# Altium PCB ESP32_HID.PcbDoc (part 2 of 2)
Units mm, origin at the board's own origin, x right, y up, seen from the top; angles counter-clockwise.
Board outline 200 x 178.5 mm, 4 copper layers (Top Layer, Layer 1, Layer 2, Bottom Layer), stack 1.781 mm thick; 132 components, 105 nets, 776 pads, 137 vias.
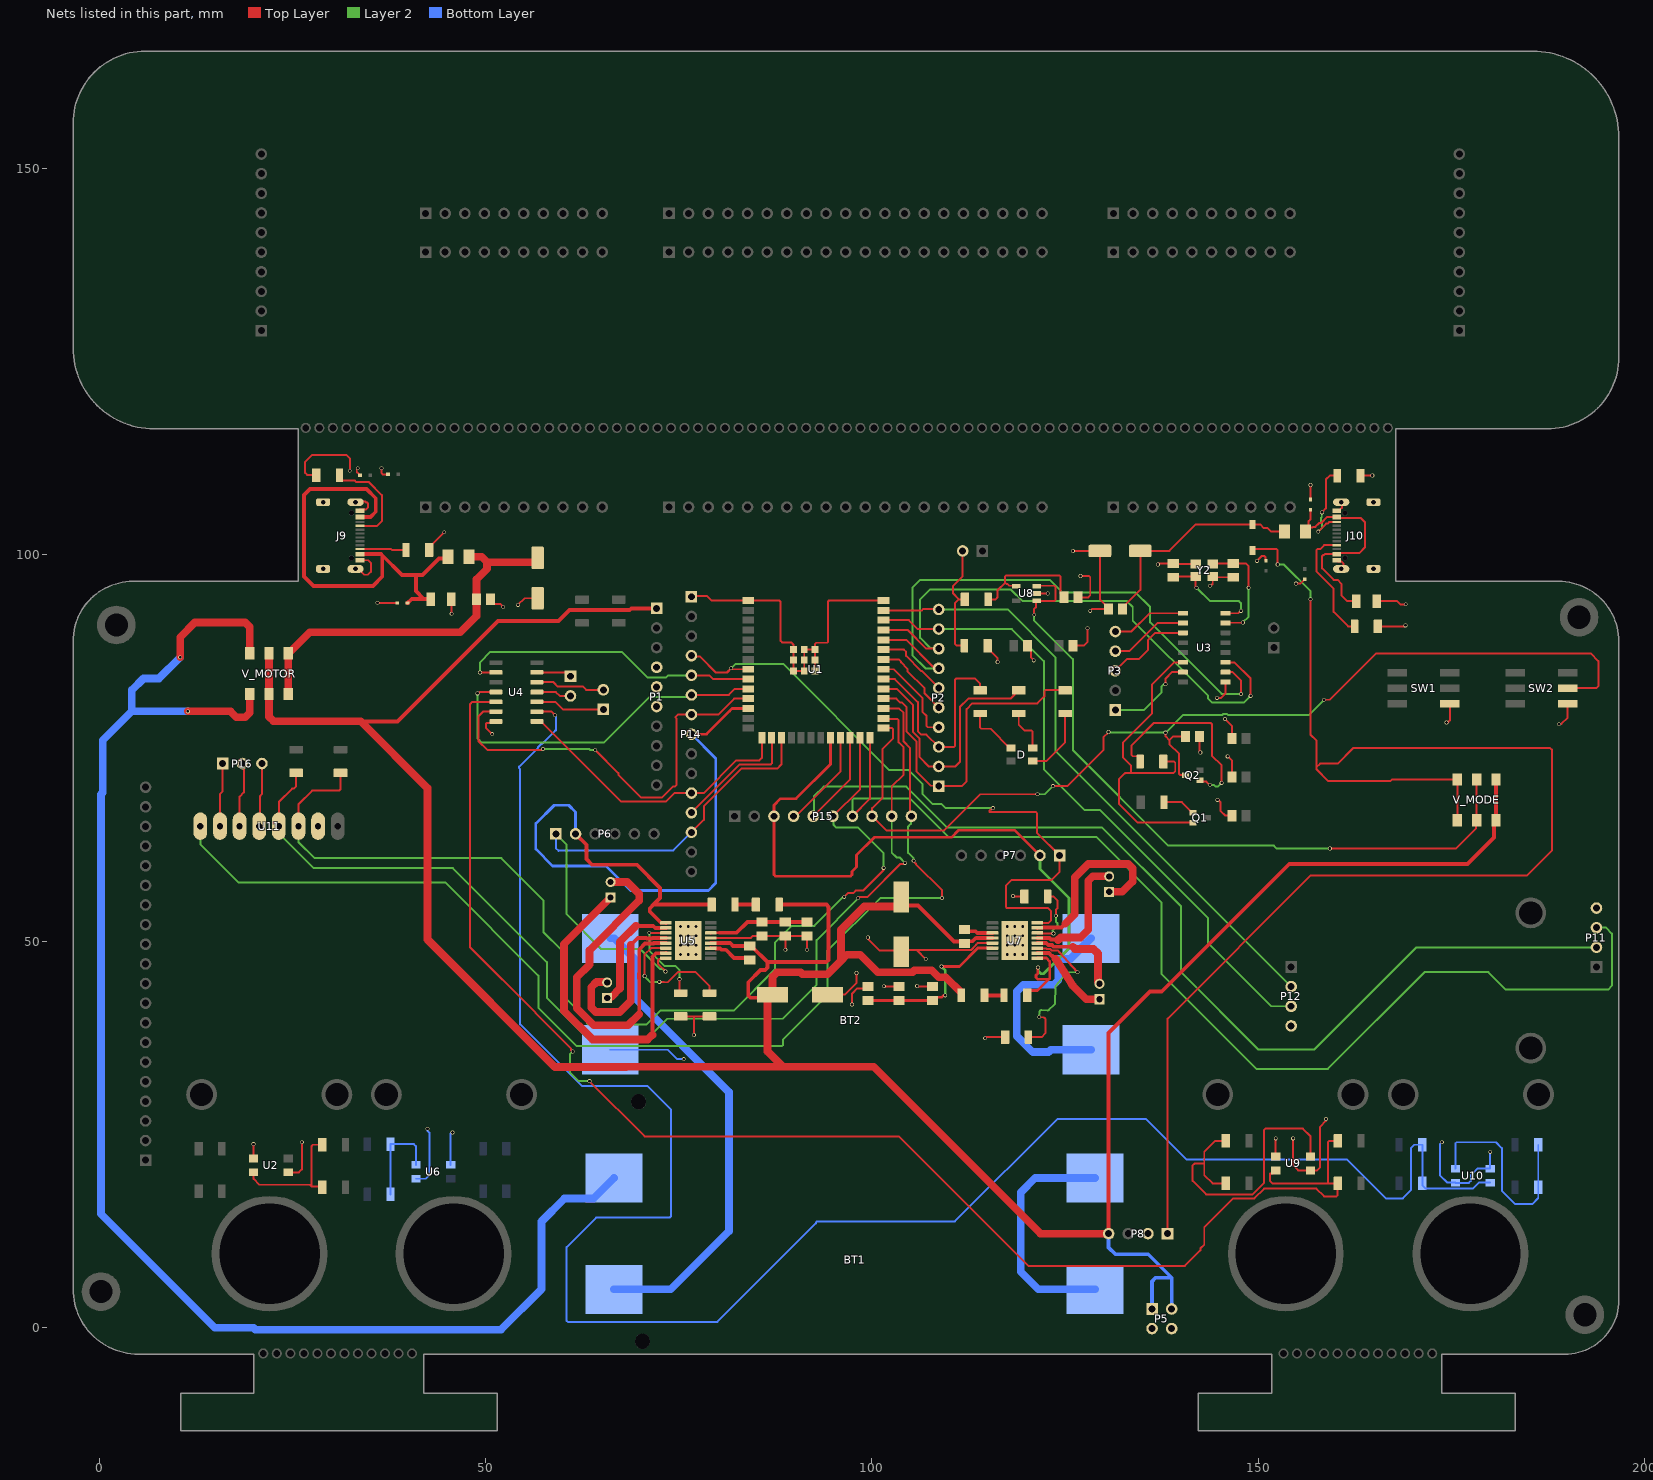
[diagram p4: the nets of this part, all layers, seen from the top]

## Via types
v1: diameter 0.5, hole 0.35, Top Layer to Bottom Layer, 137 vias

## Nets (pads, with @x,y where several pads share a name; then routed paths per layer and width w, separated by ;. In a path a pad name is that pad's centre, name@x,y a point inside that pad or via, vN(x,y) a via of type N, cw(c..) or ccw(c..) an arc to the next point about the centre after c; other vN are vias at no path point) (continued)
Encod3: R37.1 R38.1 U4.5 U9.4 | length 191.6
  Top Layer w0.254: U4.5@51.355,80.98 48.318,80.98 48,80.662 48,49.25 56.5,40.75 56.5,40.687 61.05,36.137 61.05,35.899 61.085,35.899 61.233,35.75 v1(61.3,35.75) ; v1(63.45,31.9) 70.6,24.75 103.5,24.75 120.25,8 140.5,8 142.5,10 142.5,10.25 143,10.75 143,13 146.75,16.75 149.5,16.75 150.75,18 157.5,18 158.5,17 160.101,17 160.25,17.149 160.25,18.64 R38.1@160.285,18.675 159,18.675 ; U9.4@152.25,20.35 151.877,19.977 151.527,19.977 151.527,19.877 151.5,19.85 151.5,19 151.825,18.675 159,18.675 ; R37.1@160.285,24.175 159.175,24.175 159,24 159,18.675
  Layer 2 w0.254: v1(61.3,35.75) 60.925,35.375 60.925,33.075 62.1,31.9 v1(63.45,31.9)
Encod4: R41.1 R42.1 U4.9 U10.4 | length 253.9
  Top Layer w0.254: U4.9@56.645,79.71 56.685,79.75 58.5,79.75 v1(59,79.25)
  Bottom Layer w0.254: v1(59,79.25) 59.101,79.149 59.101,77.25 59.006,77.25 57.262,75.506 57.189,75.506 56.819,75.136 56.819,75.063 54.355,72.6 54.355,72.395 54.5,72.25 54.5,39.25 62.5,31.25 71,31.25 74,28.25 74,14.399 73.851,14.25 64.308,14.25 60.5,10.442 60.5,0.899 60.649,0.75 80,0.75 92.75,13.5 92.75,13.601 92.899,13.75 110.75,13.75 124,27 135.5,27 140.75,21.75 161.5,21.75 166.5,16.75 168.705,16.75 169.75,17.795 169.75,23.25 170.175,23.675 R41.1@171.215,23.675 R42.1@171.215,18.675 171.215,18.411 171.633,17.993 177.743,17.993 178.525,18.775 U10.4@180,18.775
GLCD_CON1: P15.6 R20.1 U1.25 U11.SCL | length 138
  Top Layer w0.254: U11.SCL@25.81,64.89 25.81,67.735 27.575,69.5 31.076,69.5 31.225,69.649 31.225,71.76 R20.1@31.25,71.785 ; P15.6@94.95,66.175 98.465,69.69 U1.25@98.465,76.325 ; v1(96.425,55.75) 96.9,56.225 97.575,56.225 97.9,56.55 98.85,56.55 101.525,59.225 v1(101.525,59.5)
  Layer 2 w0.254: U11.SCL@25.81,64.89 25.81,62.84 27.85,60.8 33.75,60.8 33.775,60.775 42.6,60.775 42.625,60.75 52.05,60.75 57.5,55.3 57.5,51.2 59.825,48.875 59.825,43.2 63.15,39.875 63.15,39.374 63.299,39.225 70.825,39.225 72.625,41.025 82.125,41.025 87.45,46.35 87.45,49.825 89.625,52 92.55,52 96.225,55.675 96.283,55.675 96.358,55.75 v1(96.425,55.75) ; P15.6@94.95,66.175 95.056,66.069 95.056,65.044 95.35,64.75 98.15,64.75 101.525,61.375 v1(101.525,59.5)
GLCD_CON2: P15.9 R19.1 U1.28 U11.SDA | length 138.5
  Top Layer w0.254: U11.SDA@23.27,64.89 23.27,68.02 25,69.75 25.2,69.75 25.5,70.05 R19.1@25.5,71.785 ; v1(98.2,55.575) 98.267,55.575 98.442,55.75 99.45,55.75 103.703,60.003 104.061,60.003 104.208,60.15 v1(104.275,60.15) ; U1.28@101.5,78.845 101.57,78.775 103.301,78.775 103.45,78.626 103.45,75.725 104.095,75.08 104.095,71.559 102.57,70.034 P15.9@102.57,66.175
  Layer 2 w0.254: U11.SDA@23.27,64.89 23.27,64.001 27.796,59.475 45.775,59.475 57.95,47.3 57.95,42.7 63,37.65 71.2,37.65 73.525,39.975 88.475,39.975 92.85,44.35 92.85,50.15 98.2,55.5 v1(98.2,55.575) ; P15.9@102.57,66.175 102.57,61.48 103.211,60.839 103.586,60.839 v1(104.275,60.15)
GLCD_CON3: P15.10 U1.29 U11.INT | length 152.5
  Top Layer w0.254: U1.29@101.5,80.115 103.535,80.115 104.1,79.55 104.1,75.85 104.95,75 104.95,66.335 P15.10@105.11,66.175 ; v1(105.4,60.425) 105.4,60.358 105.7,60.058 105.7,59.95 109.075,56.575 v1(109.075,55.6)
  Layer 2 w0.254: U11.INT@13.11,64.89 13.11,62.54 18.025,57.625 44.775,57.625 56.85,45.55 56.85,41.4 61.825,36.425 88.355,36.425 88.504,36.574 88.504,37.296 94.25,43.042 94.25,48.75 101.125,55.625 103.675,55.625 103.7,55.6 v1(109.075,55.6) ; P15.10@105.11,66.175 105.043,66.108 105.043,65.193 104.7,64.85 104.7,61.45 105.37,60.78 105.37,60.455 v1(105.4,60.425)
GLCD_CON4: P2.1 R21.1 U1.30 | length 43.3
  Top Layer w0.254: U1.30@101.5,81.385 103.165,81.385 103.625,80.925 103.875,80.925 104.5,80.3 104.5,77.125 105.75,75.875 105.75,71.975 107.6,70.125 108.6,70.125 P2.1@108.65,70.075 111.6,70.075 112.25,70.725 112.25,80.025 113,80.775 121.4,80.775 122.325,81.7 122.325,82.351 122.474,82.5 124.965,82.5 R21.1@125,82.465
GLCD_CON5: P2.2 R23.1 U1.31 | length 33.3
  Top Layer w0.254: U1.31@101.5,82.655 103.195,82.655 105.325,80.525 105.325,77.075 106.15,76.25 106.15,73.85 107.385,72.615 P2.2@108.65,72.615 110.765,72.615 111.4,73.25 111.4,80.325 112.475,81.4 117.935,81.4 R23.1@119,82.465
GLCD_CON6: P2.3 R22.1 U1.32 | length 28.2
  Top Layer w0.254: U1.32@101.5,83.925 102.975,83.925 105.95,80.95 105.95,77.175 106.375,76.75 107.055,76.75 P2.3@108.65,75.155 110.631,75.155 110.78,75.304 110.78,83.871 110.929,84.02 113.28,84.02 114,83.3 R22.1@114,82.465
GLCD_CON7: P2.4 U1.33 | length 12.1
  Top Layer w0.254: U1.33@101.5,85.195 102.805,85.195 106.575,81.425 106.575,79.65 107.075,79.15 107.075,77.844 107.224,77.695 P2.4@108.65,77.695
GLCD_CON8: P2.5 U1.34 | length 10.4
  Top Layer w0.254: U1.34@101.5,86.465 103.485,86.465 103.775,86.175 103.775,86.075 104.6,85.25 104.6,84.95 106.825,82.725 106.825,82.06 P2.5@108.65,80.235
GLCD_CON9: P2.6 U1.35 | length 9.5
  Top Layer w0.254: U1.35@101.5,87.735 104.14,87.735 104.425,87.45 104.425,86.925 106.35,85 106.425,85 P2.6@108.65,82.775
GND: BT2.N1 C1.1 C2.1 C3.1 C4.1 C5.2 C6.2 C7.2 C8.2 C9.2 C13.2 C14.2 C15.2 C16.2 C17.1 C18.1 C20.N C21.1 C22.1 C23.1 C24.1 C25.N C26.1 CV.2 D2.1 D3.1 D4.1 D5.1 D6.1 D7.1 J9.A1_B12 J9.B1_A12 J9.SH1 J9.SH2 J9.SH3 J9.SH4 J10.A1_B12 J10.B1_A12 J10.SH1 J10.SH2 J10.SH3 J10.SH4 P1.4 P1.5 P1.6 P5.3 P5.4 P8.2 P11.4 P12.4 P14.1 R6.1 R7.1 R10.1 R11.1 R12.1 R13.1 R17.1 R27.1 R30.1 SW1.3 SW2.3 U1.1 U1.40 U1.41_1 U1.41_2 U1.41_3 U1.41_4 U1.41_5 U1.41_6 U1.41_7 U1.41_8 U1.41_9 U2.2 U2.3 U3.1 U4.7 U5.13 U5.17 U5.18 U5.19 U5.20 U5.21 U5.22 U5.23 U5.24 U5.25 U5.26 U5.27 U5.28 U5.29 U6.2 U6.3 U7.13 U7.17 U7.18 U7.19 U7.20 U7.21 U7.22 U7.23 U7.24 U7.25 U7.26 U7.27 U7.28 U7.29 U8.2 U9.2 U9.3 U10.2 U10.3 U11.GND Y2.2 Y2.4 | length 280.4
  Top Layer w0.254: U2.3@20,21.9 v1(20,23.75) ; U2.2@24.5,20.1 25.85,20.1 26.25,20.5 v1(26.25,24) ; R13.1@28.125,110.3 28.075,110.35 26.925,110.35 26.675,110.6 26.675,112.025 27.575,112.925 32,112.925 32.45,112.475 v1(32.45,110.875) ; J9.SH2@33.18,98.18 33.574,98.18 34.275,97.479 34.275,97.425 34.8,97.425 35.175,97.8 35.175,98.95 34.825,99.3 J9.B1_A12@33.755,99.3 ; J9.SH1@33.18,106.82 33.26,106.9 34.425,106.9 34.55,106.775 34.676,106.775 34.825,106.626 34.825,106.15 34.548,105.873 33.711,105.873 33.646,105.809 J9.A1_B12@33.755,105.7 ; v1(33.475,111.2) 33.475,111.133 33.347,111.006 33.347,110.718 33.652,110.413 33.652,110.373 33.725,110.3 D7.1@33.765,110.3 ; v1(36.025,93.8) 36.075,93.75 D5.1@38.59,93.75 ; v1(36.55,111.2) 36.525,111.175 36.525,110.6 36.7,110.425 D6.1@37.4,110.425 ; R12.1@42.715,100.625 42.715,100.965 v1(44.675,102.925) ; C18.1@45.6,94.25 45.625,94.225 v1(45.625,92.375) ; C23.1@50.65,94.25 50.65,94.1 51.098,93.652 51.898,93.652 v1(52.3,93.25) ; v1(50.875,76.8) 50.05,77.625 50.05,78.123 50.199,78.272 51.187,78.272 U4.7@51.355,78.44 ; v1(54.2,93.525) 55.06,94.385 C20.N@56.75,94.385 ; R6.1@75.25,40.285 77.125,40.285 ; P14.1@76.65,94.575 76.725,94.65 78.7,94.65 79.265,94.085 U1.1@84,94.085 88.026,94.085 88.175,93.936 88.175,88.875 88.375,88.675 89.575,88.675 89.85,88.4 U1.41_1@89.85,87.765 U1.41_4@89.85,86.365 U1.41_7@89.85,84.965 U1.41_8@91.25,84.965 U1.41_5@91.25,86.365 U1.41_2@91.25,87.765 U1.41_3@92.65,87.765 ; v1(76.965,37.865) 77,37.9 77,40.16 77.125,40.285 ; R7.1@79,40.285 77.125,40.285 ; U5.13@79.15,50.425 84.325,50.425 84.6,50.7 C8.2@85.8,50.7 C7.2@88.8,50.7 ; v1(88.8,48.9) C7.2@88.8,50.7 ; v1(91.6,48.9) C9.2@91.6,50.7 C7.2@88.8,50.7 ; U1.41_9@92.65,84.965 U1.41_6@92.65,86.365 U1.41_3@92.65,87.765 ; CV.2@94.25,43.1 96.5,43.1 98,44.6 98,45.883 v1(98.009,45.891) ; v1(97.425,41.825) 97.425,43.225 98.1,43.9 98.902,43.9 98.95,43.948 98.95,44.075 99.025,44.15 C14.2@99.5,44.15 ; v1(99.475,50.5) 99.475,50.3 100.95,48.825 103.625,48.825 C16.2@103.8,48.65 104.021,48.871 105.804,48.871 ; U1.40@101.5,94.085 101.486,94.099 94.398,94.099 94.375,94.076 94.375,93.975 94.35,93.95 94.35,88.774 94.201,88.625 92.799,88.625 92.65,88.476 U1.41_3@92.65,87.765 ; v1(101.55,44.175) 101.575,44.15 C13.2@103.5,44.15 ; v1(105.85,44.225) 105.925,44.15 C15.2@107.85,44.15 ; v1(106.975,47.7) 105.804,48.871 ; v1(114.65,37.45) 114.8,37.6 R10.1@117.235,37.6 ; R17.1@114.965,88.25 114.965,87.91 116.275,86.6 v1(116.275,86.125) ; U7.13@115.6,49.775 113.675,49.775 113.456,49.556 113.456,49.497 112.83,48.871 105.804,48.871 ; v1(118.25,55.85) 118.3,55.8 R11.1@119.735,55.8 ; C21.1@120.15,88.25 120.598,87.802 120.598,86.702 v1(120.95,86.35) ; U8.2@121.3,95 v1(122.75,95) ; C22.1@126,88.25 127.425,88.25 127.925,88.75 127.925,90.475 v1(127.9,90.5) ; v1(126,100.5) C25.N@129.5,100.5 129.5,94.25 130.6,93.15 C26.1@130.6,93 128.5,93 v1(128.25,92.75) ; C17.1@126.65,94.5 128,94.5 128.25,94.75 128.25,97.101 128.101,97.25 v1(127,97.25) ; v1(137,98.75) 137.15,98.9 C6.2@139,98.9 139.1,98.8 Y2.2@141.9,98.8 ; C2.1@142.4,76.5 142.4,74.525 v1(142.5,74.425) ; v1(143.75,96) 143.817,96 143.965,96.149 144.1,96.149 Y2.4@144.1,97.2 144.2,97.1 C5.2@146.75,97.1 ; v1(144.65,81.5) 145.175,81.5 145.75,82.075 U3.1@145.75,83.555 ; v1(144.725,68.3) 144.792,68.3 145.067,68.025 145.1,68.025 145.1,66.9 145.75,66.25 C1.1@146.6,66.25 ; v1(145.7,78.75) 146.6,77.85 C3.1@146.6,76.25 ; v1(146.025,73.925) 146.6,73.35 C4.1@146.6,71.25 ; v1(149.825,99.225) 150.45,99.85 150.75,99.85 150.927,99.673 150.927,99.323 D4.1@151,99.25 ; U9.2@152.25,22.15 v1(152.25,24.5) ; v1(154.5,24.5) 154.5,21 155.15,20.35 U9.3@156.75,20.35 157.6,20.35 158,20.75 158,26 158.75,26.75 v1(158.75,27) ; v1(154.875,96.275) 155.435,96.275 155.887,96.727 155.927,96.727 156,96.8 D3.1@156,96.84 ; D2.1@156.75,107.16 v1(156.75,109.025) ; J10.A1_B12@160.145,99.3 160.318,99.127 160.781,99.127 160.996,98.912 160.996,98.456 J10.SH1@160.72,98.18 ; J10.B1_A12@160.145,105.7 160.42,105.7 160.808,106.088 160.808,106.732 J10.SH2@160.72,106.82 ; R30.1@163.215,110.25 164.725,110.25 v1(164.75,110.275) ; C24.1@165.35,94 167.95,94 168.4,93.55 169.025,93.55 v1(169.075,93.6) ; R27.1@165.465,90.75 168.925,90.75 v1(169.05,90.875) ; v1(174.35,78.3) 174.5,78.3 174.775,78.575 SW1.3@174.775,80.75 ; v1(188.9,78.075) 188.95,78.125 189.2,78.125 190.025,78.95 SW2.3@190.025,80.75
  Bottom Layer w0.254: U6.3@41,19.275 42.275,19.275 42.75,19.75 42.75,25.25 42.5,25.5 v1(42.5,25.75) ; U6.2@45.5,21.075 45.5,25.101 45.535,25.101 45.683,25.25 v1(45.75,25.25) ; BT2.N1@66.145,35.965 73.615,35.965 74.826,34.754 v1(75.665,34.754) ; v1(173.75,24) 173.5,23.75 173.5,19.75 174.475,18.775 U10.3@175.5,18.775 175.525,18.75 177.25,18.75 177.5,19 177.5,19.75 178.325,20.575 U10.2@180,20.575 v1(180,22.75)
IN: U8.1 U8.3 V_MODE.2 V_MODE.5 | length 93
  Top Layer w0.254: v1(121,92.25) 121,93 121.25,93.25 121.25,93.9 121.35,94 123.601,94 123.75,94.149 123.75,95.851 123.601,96 121.35,96 U8.3@121.3,95.95 ; v1(159.25,62) 175.525,62 178.168,64.643 178.168,65.593 V_MODE.2@178.25,65.675 V_MODE.5@178.25,70.925
  Layer 2 w0.254: v1(121,92.25) 121,91.5 126,86.5 126,74.75 138.365,62.385 152.011,62.385 152.396,62 v1(159.25,62)
IO0: C2.2 P15.8 Q2.3 SW2.2 U1.27 | length 136.1
  Top Layer w0.254: U1.27@101.5,77.575 102.601,77.575 102.75,77.426 102.75,76.275 101.375,74.9 101.375,68.575 100.03,67.23 P15.8@100.03,66.175 101.9,64.305 109.305,64.305 114.025,69.025 v1(121.425,69.025) ; v1(123.425,70.075) 125.3,70.075 129.95,74.725 129.95,76.4 v1(130.625,77.075) ; v1(138,77) 138,76.5 138.5,76 ; Q2.3@140.55,71.5 139.899,71.5 139.75,71.649 139.75,74.25 138.5,75.5 138.5,76 ; C2.2@140.6,76.5 139,76.5 138.5,76 ; v1(158.5,81.25) 159.25,81.25 165.25,87.25 193,87.25 194,86.25 194,83 193.75,82.75 SW2.2@190.025,82.75
  Layer 2 w0.254: v1(121.425,69.025) 122.375,69.025 v1(123.425,70.075) ; v1(130.625,77.075) 130.663,77.038 137.963,77.038 v1(138,77) 140.25,79.25 145.308,79.25 145.439,79.381 145.961,79.381 146.092,79.25 156.5,79.25 v1(158.5,81.25)
IO1: P2.10 P12.2 U1.39 | length 80.1
  Top Layer w0.254: U1.39@101.5,92.815 106.465,92.815 106.625,92.975 108.61,92.975 P2.10@108.65,92.935
  Layer 2 w0.254: P2.10@108.65,92.935 117.565,92.935 123.75,86.75 123.75,74.635 137.135,61.25 P12.2@154.25,44.135
IO2: P2.9 P12.3 U1.38 | length 83.5
  Top Layer w0.254: U1.38@101.5,91.545 104.78,91.545 105.93,90.395 P2.9@108.65,90.395
  Layer 2 w0.254: P2.9@108.65,90.395 118.105,90.395 122.25,86.25 122.25,72.25 127.5,67 129.5,67 143.5,53 143.5,49.75 151.655,41.595 P12.3@154.25,41.595
IO3: P14.11 U1.15 U4.8 | length 38.4
  Top Layer w0.254: U4.8@56.645,78.44 57.185,78.44 67.55,68.075 73.35,68.075 74.45,69.175 P14.11@76.65,69.175 78.25,69.175 82.475,73.4 85.45,73.4 85.765,73.715 U1.15@85.765,76.325
IO16: P14.5 U1.9 U4.2 | length 40.3
  Top Layer w0.254: v1(49.3,84.775) 49.315,84.79 U4.2@51.355,84.79 ; P14.5@76.65,84.415 78.985,84.415 79.475,83.925 U1.9@84,83.925
  Layer 2 w0.254: v1(49.3,84.775) 49.3,86.1 50.65,87.45 67.65,87.45 70.95,84.15 73.375,84.15 73.64,84.415 P14.5@76.65,84.415
IO17: P14.6 U1.10 U4.4 | length 46.4
  Top Layer w0.254: v1(48.975,82.075) 49.075,82.075 49.25,82.25 U4.4@51.355,82.25 ; P14.6@76.65,81.875 81.5,81.875 82.28,82.655 U1.10@84,82.655
  Layer 2 w0.254: v1(48.975,82.075) 48.975,76.25 49.525,75.7 65.3,75.7 71.2,81.6 75.878,81.6 75.915,81.637 76.412,81.637 P14.6@76.65,81.875
IO18: P14.7 U1.11 U4.6 | length 54.5
  Top Layer w0.254: U4.6@51.355,79.71 49.685,79.71 49.1,79.125 49.1,75.9 50.275,74.725 57.3,74.725 v1(57.45,74.875) ; v1(64.2,74.75) 67.199,71.751 67.199,71.551 70.15,68.6 72.825,68.6 74.277,70.052 74.551,70.052 74.7,70.201 74.7,78.825 74.605,78.92 74.605,79.054 74.886,79.335 P14.7@76.65,79.335 80.135,79.335 82.185,81.385 U1.11@84,81.385
  Layer 2 w0.254: v1(57.45,74.875) 63.442,74.875 63.567,74.75 v1(64.2,74.75)
IO21: P15.4 U1.23 | length 12.8
  Top Layer w0.254: P15.4@89.87,66.175 90.15,66.175 95.925,71.95 U1.23@95.925,76.325
IO33: P11.2 P15.5 U1.24 | length 141
  Top Layer w0.254: P15.5@92.41,66.175 97.195,70.96 U1.24@97.195,76.325
  Layer 2 w0.254: P15.5@92.41,66.175 92.5,66.265 92.5,68.75 93.75,70 104.45,70 109.7,64.75 129.75,64.75 140,54.5 140,46 150,36 157.25,36 170.465,49.215 P11.2@193.75,49.215
IO45: P11.3 P15.7 U1.26 | length 146.9
  Top Layer w0.254: P15.7@97.49,66.175 99.735,68.42 U1.26@99.735,76.325
  Layer 2 w0.254: P15.7@97.49,66.175 97.5,66.185 97.5,68.351 97.649,68.5 104.875,68.5 109.875,63.5 129,63.5 137.5,55 137.5,45.75 149.75,33.5 159,33.5 171.5,46 179.75,46 182,43.75 195.25,43.75 195.75,44.25 195.75,51 194.995,51.755 193.755,51.755 193.75,51.75 P11.3@193.75,51.755
IO46: P14.12 U1.16 | length 16.4
  Top Layer w0.254: P14.12@76.65,66.635 82.915,72.9 86.926,72.9 87.075,73.049 87.075,76.285 U1.16@87.035,76.325
NetBT1_N1: BT1.N1 BT2.P2 | length 62.5
  Bottom Layer w1: BT2.P2@66.145,50.385 66.64,50.385 69.315,47.71 69.315,42.685 81.5,30.5 81.5,12.5 73.965,4.965 BT1.N1@66.645,4.965
NetBT1_N2: BT1.N2 BT1.P1 | length 31.2
  Bottom Layer w1: BT1.P1@128.855,4.965 121.535,4.965 119.25,7.25 119.25,17.5 121.135,19.385 BT1.N2@128.855,19.385
NetBT2_N2: BT2.N2 BT2.P1 | length 30.4
  Bottom Layer w1: BT2.P1@128.355,35.965 123.161,35.965 122.86,35.664 120.836,35.664 118.75,37.75 118.75,43.5 119.612,44.362 123.524,44.362 124.11,44.948 124.11,47.71 125.68,47.71 BT2.N2@128.355,50.385
NetC5_1: C5.1 U3.7 Y2.1 | length 14.7
  Top Layer w0.254: Y2.1@144.1,98.8 144.2,98.9 C5.1@146.75,98.9 148.35,98.9 148.75,98.5 v1(148.75,95.75) ; U3.7@145.75,91.175 145.788,91.212 147.963,91.212 v1(148,91.25)
  Layer 2 w0.254: v1(148,91.25) 148.75,92 v1(148.75,95.75)
NetC6_1: C6.1 U3.8 Y2.3 | length 14.1
  Top Layer w0.254: C6.1@139,97.1 139.1,97.2 Y2.3@141.9,97.2 141.9,95.85 v1(142,95.75) ; U3.8@145.75,92.445 147.378,92.445 147.683,92.75 v1(147.75,92.75)
  Layer 2 w0.254: v1(142,95.75) 143.75,94 147.5,94 147.75,93.75 v1(147.75,92.75)
NetC7_1: C7.1 C8.1 C9.1 U5.14 | length 13
  Top Layer w0.354: U5.14@79.15,51.075 79.175,51.1 80.3,51.1
  Top Layer w0.5: 80.3,51.1 82.5,51.1 83.9,52.5 C8.1@85.8,52.5 C7.1@88.8,52.5 C9.1@91.6,52.5
NetC11_2: C11.2 U5.11 | length 5.7
  Top Layer w0.5: U5.11@79.15,49.125 79.175,49.1 79.799,49.1 79.822,49.077 80.336,49.077 80.513,48.9 81.1,48.9 82.175,47.825 83.975,47.825 C11.2@84.2,47.6
NetC12_2: C12.2 U7.11 | length 3.8
  Top Layer w0.5: C12.2@112,51.5 112.2,51.3 113.4,51.3 113.625,51.075 U7.11@115.6,51.075
NetC13_1: C13.1 C14.1 C15.1 U7.14 | length 21.8
  Top Layer w0.354: C14.1@99.5,42.35 C13.1@103.5,42.35 C15.1@107.85,42.35 108.248,42.748 108.998,42.748 109.25,43 v1(109.5,43) ; v1(109,46.75) 111.319,46.75 113.694,49.125 U7.14@115.6,49.125
  Layer 2 w0.354: v1(109,46.75) 109,46.71 109.5,46.21 v1(109.5,43)
NetC17_2: C17.2 R16.2 U8.4 | length 16.2
  Top Layer w0.254: R16.2@115.04,94.25 116,94.25 116.25,94.5 116.25,95.399 117.25,96.399 ; U8.4@118.7,95.95 118.65,96 117.75,96 117.5,96.25 117.399,96.25 117.25,96.399 ; C17.2@124.85,94.5 124.402,94.948 124.402,95.239 124.394,95.247 124.394,97.207 124.245,97.356 117.399,97.356 117.25,97.207 117.25,96.399
NetC18_2: C18.2 D5.2 FL1.1 J9.A4_B9 J9.B4_A9 | length 58.8
  Top Layer w0.5: J9.B4_A9@33.755,100.1 36.5,100.1 36.65,99.95 ; J9.A4_B9@33.755,104.9 35.125,104.9 35.8,105.575 35.8,107.325 34.6,108.525 27.3,108.525 26.525,107.75 26.525,97.2 27.75,95.975 35.45,95.975 36.65,97.175 36.65,99.95 ; D5.2@39.91,93.75 40.46,94.3 42,94.3 ; C18.2@42.9,94.25 42.85,94.3 42,94.3 ; FL1.1@45.14,99.75 44.898,99.508 43.983,99.508 41.85,97.375 41,97.375 ; 36.65,99.95 39.225,97.375 41,97.375 ; 41,97.375 41,95.3 42,94.3
NetC24_2: C24.2 D2.2 FL2.1 J10.A4_B9 J10.B4_A9 | length 29.2
  Top Layer w0.254: FL2.1@156.11,103 FL2.1@156.5,103.39 ; D2.2@156.75,105.84 156.75,104.601 156.5,104.351 FL2.1@156.5,103.39 ; C24.2@162.65,94 161.5,94 160.75,94.75 160.75,96.25 160.25,96.75 159.75,96.75 158.25,98.25 158.25,99.851 158.399,100 158.5,100 158.6,100.1 J10.A4_B9@160.145,100.1 160.276,100.231 160.919,100.231 160.95,100.262 161.49,100.262 161.521,100.231 163.031,100.231 163.8,101 163.8,104.2 163.231,104.769 161.521,104.769 161.49,104.738 160.95,104.738 160.919,104.769 160.276,104.769 J10.B4_A9@160.145,104.9 158.9,104.9 158.119,104.119 157.869,104.119 157.381,103.631 157.131,103.631 157.042,103.542 156.652,103.542 FL2.1@156.5,103.39
NetC25_P: C25.P C26.2 D1.A FL2.2 | length 28.9
  Top Layer w0.254: C26.2@132.4,93 132.4,93.15 134.73,95.48 C25.P@134.73,100.5 138.5,100.5 141.93,103.93 D1.A@149.25,103.93 150.237,103.93 150.715,103.452 151.201,103.452 151.653,103 FL2.2@153.39,103
NetD_2: D.2 R21.2 | length 8.9
  Top Layer w0.254: D.2@120.8,73.3 122.55,73.3 125,75.75 R21.2@125,79.46
NetD_3: D.3 R23.2 | length 5.7
  Top Layer w0.254: R23.2@119,79.46 119,78 119.75,77.25 120.651,77.25 120.8,77.101 D.3@120.8,75
NetD_4: D.4 R22.2 | length 6.9
  Top Layer w0.254: R22.2@114,79.46 114,77.649 114.149,77.5 115.35,77.5 117.85,75 D.4@118,75
NetJ9_A5: J9.A5 R13.2 | length 13.2
  Top Layer w0.254: R13.2@31.13,110.3 31.13,109.951 31.473,109.608 33.117,109.608 33.3,109.425 34.9,109.425 36.6,107.725 36.6,104.35 36,103.75 J9.A5@33.755,103.75
NetJ9_B5: J9.B5 R12.2 | length 6
  Top Layer w0.254: J9.B5@33.755,100.75 37.8,100.75 37.925,100.625 R12.2@39.71,100.625
NetJ10_A5: J10.A5 R27.2 | length 15.3
  Top Layer w0.254: J10.A5@160.145,101.25 158.5,101.25 158,100.75 157.649,100.75 157.5,100.601 157.5,97.874 159.75,95.624 159.75,92.609 161.609,90.75 R27.2@162.46,90.75
NetJ10_B5: J10.B5 R30.2 | length 11.9
  Top Layer w0.254: v1(157.75,103) 158.784,104.034 158.966,104.034 159.181,104.25 J10.B5@160.145,104.25 ; v1(158.25,105.5) 158.75,106 158.75,109.75 159.25,110.25 R30.2@160.21,110.25
  Layer 2 w0.254: v1(157.75,103) 158.25,103.5 158.25,104.188 158.101,104.337 158.101,104.776 158.203,104.878 158.203,105.453 v1(158.25,105.5)
NetJ_M1_1: J_M1.1 U7.2 | length 11
  Top Layer w0.5: U7.2@121.4,48.475 122.9,48.475 123.278,48.096 123.404,48.096 123.75,47.75
  Top Layer w1: 123.75,47.75 123.751,47.749 cw(c123.044,47.042) 123.89,47.575 125.906,44.379 ccw(c126.752,44.913) 126.043,44.207 127.75,42.5 J_M1.1@129.45,42.5
NetJ_M1_2: J_M1.2 U7.4 | length 12.4
  Top Layer w0.5: U7.4@121.4,49.775 122.552,49.775 122.827,49.5 123.3,49.5 123.512,49.288 126,49.288
  Top Layer w1: 126,49.288 126.25,49 128.664,49 129.25,48.414 129.25,44.783 129.45,44.583 J_M1.2@129.45,44.5
NetJ_M2_1: J_M2.1 U7.7 | length 24.1
  Top Layer w0.5: U7.7@121.4,51.725 121.425,51.75 122.049,51.75 122.072,51.773 124.523,51.773 125.025,52.275
  Top Layer w1: 125.025,52.275 126.25,53.5 126.25,58.25 128,60 133.164,60 133.75,59.414 133.75,57.75 132.4,56.4 J_M2.1@130.7,56.4
NetJ_M2_2: J_M2.2 U7.5 | length 16.5
  Top Layer w0.5: U7.5@121.4,50.425 123.009,50.425 123.188,50.246 124.004,50.246 124.085,50.165
  Top Layer w1: 124.085,50.165 124.42,50.5 127,50.5 128,51.5 128,57.814 128.586,58.4 J_M2.2@130.7,58.4
NetJ_M3_1: J_M3.1 U5.2 | length 15.1
  Top Layer w0.5: 69.475,52 71.7,52 71.975,51.725 U5.2@73.35,51.725
  Top Layer w1: J_M3.1@65.75,42.675 65.904,42.829 66.329,42.829 67.4,43.9 67.4,49.925 69.475,52
NetJ_M3_2: J_M3.2 U5.4 | length 23.2
  Top Layer w0.5: 68.8,49.525 69.7,50.425 70.809,50.425 70.888,50.346 71.512,50.346 71.591,50.425 U5.4@73.35,50.425
  Top Layer w1: J_M3.2@65.75,44.675 65.691,44.734 64.366,44.734 63.675,44.043 63.675,41.436 64.261,40.85 67.375,40.85 68.8,42.275 68.8,49.525
NetJ_M4_1: J_M4.1 U5.7 | length 42.5
  Top Layer w0.5: 71.6,37.886 71.6,48 72.05,48.45 73.325,48.45 U5.7@73.35,48.475
  Top Layer w1: J_M4.1@66.2,55.675 60.15,49.625 60.15,41 63.85,37.3 71.014,37.3 71.6,37.886
NetJ_M4_2: J_M4.2 U5.5 | length 44.3
  Top Layer w0.5: 69.9,40.575 69.9,45.134 69.846,45.188 69.846,45.812 69.9,45.866 69.9,48.96 70.659,49.719 71.772,49.719 71.828,49.775 U5.5@73.35,49.775
  Top Layer w1: J_M4.2@66.2,57.675 66.204,57.671 68.354,57.671 69.911,56.114 69.911,55.286 63.475,48.85 63.475,47 61.825,45.35 61.825,41.325 64.025,39.125 68.45,39.125 69.9,40.575
NetP3_4: P3.4 U3.10 | length 10.3
  Top Layer w0.254: P3.4@131.5,87.54 133.29,87.54 136.925,91.175 U3.10@140.25,91.175
NetP3_5: P3.5 U3.9 | length 9.7
  Top Layer w0.254: P3.5@131.5,90.08 133.58,90.08 135.945,92.445 U3.9@140.25,92.445
NetP9_1: P9.1 U4.13 | length 4.6
  Top Layer w0.254: U4.13@56.645,84.79 60.5,84.79 P9.1@61,84.29
NetP9_2: P9.2 U4.11 | length 4.6
  Top Layer w0.254: U4.11@56.645,82.25 59.125,82.25 59.625,81.75 P9.2@61,81.75
NetP10_1: P10.1 U4.10 | length 9
  Top Layer w0.254: U4.10@56.645,80.98 59.02,80.98 60,80 P10.1@65.25,80
NetP10_2: P10.2 U4.12 | length 9
  Top Layer w0.254: U4.12@56.645,83.52 58.805,83.52 59.375,82.95 62.625,82.95 63.035,82.54 P10.2@65.25,82.54
NetP13_2: P13.2 R16.1 R17.2 | length 15.1
  Top Layer w0.254: P13.2@111.75,100.5 111.75,97.25 110.5,96 110.5,95 111.25,94.25 ; R17.2@111.96,88.25 111,88.25 110.75,88.5 110.75,93.75 111.25,94.25 ; R16.1@112.035,94.25 111.25,94.25
NetP16_1: P16.1 U11.ADO | length 8.3
  Top Layer w0.254: U11.ADO@15.65,64.89 15.65,69.05 16,69.4 P16.1@16,73
NetP16_2: P16.2 U11.XCL | length 8.4
  Top Layer w0.254: U11.XCL@18.19,64.89 18.19,68.715 18.75,69.275 18.75,72.79 P16.2@18.54,73
NetP16_3: P16.3 U11.XDA | length 8.3
  Top Layer w0.254: U11.XDA@20.73,64.89 20.85,65.01 20.85,68.8 21.08,69.03 P16.3@21.08,73
NetQ1_1: Q1.1 R1.2 | length 4.3
  Top Layer w0.254: R1.2@137.79,68 140.1,68 141.45,66.65 Q1.1@141.55,66.65
NetQ2_1: Q2.1 R2.2 | length 26.1
  Top Layer w0.254: R2.2@134.71,73.25 134.71,73.599 134.367,73.942 133.745,73.942 133.597,74.091 133.597,75.347 136.5,78.25 143.851,78.25 144,78.101 144,74 145.25,72.75 v1(145.25,70.5) ; Q2.1@142.45,70.85 142.648,70.652 143.281,70.652 143.683,70.25 v1(143.75,70.25)
  Layer 2 w0.254: v1(143.75,70.25) 143.797,70.203 144.293,70.203 144.496,70 144.75,70 v1(145.25,70.5)
NetR4_1: R4.1 R5.2 | length 2.7
  Top Layer w0.5: R5.2@82.29,54.75 R4.1@85,54.75
NetR6_2: R6.2 U5.3 | length 12.5
  Top Layer w0.254: v1(71.2,51.1) 72.2,51.1 72.225,51.075 U5.3@73.35,51.075 ; v1(75.1,45.1) 75.1,43.44 R6.2@75.25,43.29
  Layer 2 w0.254: v1(71.2,51.1) 71.2,48.8 73.2,46.8 74.6,46.8 75.1,46.3 v1(75.1,45.1)
NetR7_2: R7.2 U5.6 | length 16.9
  Top Layer w0.254: v1(70.6,45.5) 70.6,48.3 71.425,49.125 U5.6@73.35,49.125 ; v1(72.5,44.75) 72.547,44.703 73.122,44.703 73.125,44.7 73.6,44.7 74.9,46 77.2,46 79,44.2 R7.2@79,43.29
  Layer 2 w0.254: v1(70.6,45.5) 70.6,45.433 71.006,45.027 71.006,44.994 71.3,44.7 71.842,44.7 71.869,44.727 72.477,44.727 v1(72.5,44.75)
NetR8_1: R8.1 R9.2 | length 2.5
  Top Layer w0.5: R8.1@114.565,43 R9.2@117.095,43
NetR10_2: R10.2 U7.3 | length 20.8
  Top Layer w0.254: R10.2@120.24,37.6 121.95,37.6 122.45,38.1 122.45,39.876 ccw(c122.196,39.876) 122.227,40.128 v1(121.65,40.2) ; U7.3@121.4,49.125 121.442,49.083 122.531,49.083 122.635,48.979 123.109,48.979 123.303,48.784 124.085,48.784 124.202,48.667 124.211,48.657 v1(126.6,46)
  Layer 2 w0.254: v1(121.65,40.2) 121.683,40.848 cw(c121.937,40.835) 121.945,41.089 ; 121.946,41.089 122.719,41.061 ccw(c122.728,41.315) 122.9,41.128 123.615,41.793 ccw(c123.441,41.978) 123.695,41.969 123.773,44.111 cw(c124.027,44.101) 123.829,44.26 125.151,45.897 cw(c125.348,45.737) 125.401,45.985 ccw(c125.455,46.233) 125.459,45.979 v1(126.6,46)
NetR11_2: R11.2 U7.6 | length 8.4
  Top Layer w0.254: U7.6@121.4,51.075 121.475,51 v1(123.5,51) ; R11.2@122.74,55.8 123.46,55.8 124.025,55.235 124.025,54.308 123.8,54.083 v1(123.8,53.3)
  Layer 2 w0.254: v1(123.5,51) 123.453,51.047 123.453,51.257 123.355,51.355 124,52 124,52.342 123.8,52.542 v1(123.8,53.3)
NetR14_1: R14.1 R15.1 U2.1 | length 16.9
  Top Layer w0.254: U2.1@20,20.1 20,19.25 20.75,18.5 27.25,18.5 27.5,18.25 ; R14.1@28.885,18.175 28.81,18.25 27.5,18.25 ; R15.1@28.885,23.675 27.675,23.675 27.5,23.5 27.5,18.25
NetR31_1: R31.1 R32.1 U6.1 | length 12.3
  Bottom Layer w0.254: R32.1@37.715,17.25 R31.1@37.715,23.75 40.75,23.75 41,23.5 U6.1@41,21.075
NetR35_1: R35.1 R36.1 U9.1 | length 39.7
  Top Layer w0.254: R35.1@145.785,18.675 144.075,18.675 143,19.75 143,21.25 ; R36.1@145.785,24.175 144.425,24.175 143,22.75 143,21.25 ; U9.1@156.75,22.15 156.75,24.75 155.75,25.75 150.899,25.75 150.75,25.601 150.75,18.75 149.25,17.25 143.25,17.25 141.5,19 141.5,21 141.75,21.25 143,21.25
NetR39_1: R39.1 R40.1 U10.1 | length 27.8
  Bottom Layer w0.254: U10.1@175.5,20.575 175.5,23.851 175.649,24 180.75,24 181.5,23.25 181.5,17.75 183.25,16 185.43,16 186.215,16.785 R40.1@186.215,18.175 R39.1@186.215,23.675
NFAULT: P6.1 P14.13 U1.17 U5.8 | length 70.1
  Top Layer w0.254: v1(73.3,46.1) 72.35,47.05 72.35,47.578 72.499,47.727 73.252,47.727 U5.8@73.35,47.825 ; P14.13@76.65,64.095 78.275,65.72 78.275,67.475 83.175,72.375 87.5,72.375 87.545,72.33 87.755,72.33 88.305,72.88 U1.17@88.305,76.325
  Layer 2 w0.254: P6.1@59.12,63.9 60.5,62.52 60.5,53.5 65,49 70,49 72.564,46.436 72.897,46.436 73.233,46.1 v1(73.3,46.1)
  Bottom Layer w0.254: P6.1@59.12,63.9 59.12,62.063 59.479,61.704 59.525,61.75 74.305,61.75 P14.13@76.65,64.095
NFAULT_2: P7.1 P14.4 U1.8 U7.8 | length 86.8
  Top Layer w0.254: P14.4@76.65,86.955 76.786,86.819 77.781,86.819 79.825,84.775 81.253,84.775 81.775,85.297 v1(81.775,85.325) ; 81.558,85.195 81.775,85.195 U1.8@84,85.195 ; v1(115.675,67.225) 115.608,67.225 115.418,67.035 115.332,67.035 115.208,66.91 115.208,66.7 121.226,66.7 121.375,66.551 121.375,64.005 P7.1@124.28,61.1 124.28,58.98 123.2,57.9 118.05,57.9 117.325,57.175 117.325,54.449 117.474,54.3 122.8,54.3 123.169,53.931 123.169,53.039 123.2,53.008 123.2,52.7 122.875,52.375 U7.8@121.4,52.375
  Layer 2 w0.254: v1(81.775,85.325) 81.797,85.325 82.322,85.85 88.575,85.85 102.275,72.15 104.75,72.15 106.575,70.325 106.575,69.025 107.85,67.75 109.025,67.75 109.55,67.225 v1(115.675,67.225)
NSLEEP: P6.2 P14.8 R5.1 U1.12 U5.1 | length 96.6
  Top Layer w0.354: P14.8@76.65,76.795 78.62,76.795 81.6,79.775 81.6,79.793 81.922,80.115 U1.12@84,80.115
  Top Layer w0.5: P6.2@61.66,63.9 63.063,62.497 63.063,60.637 63.8,59.9 69.6,59.9 72.6,56.9 72.6,55.6 71.75,54.75 ; U5.1@73.35,52.375 73.325,52.4 72.7,52.4 71.257,53.843 71.257,54.257 71.75,54.75 ; R5.1@79.285,54.75 71.75,54.75
  Bottom Layer w0.354: P6.2@61.66,63.9 61.66,66.715 60.775,67.6 58.9,67.6 56.525,65.225 56.525,61.925 58.7,59.75 65.583,59.75 68.758,56.575 78.85,56.575 79.8,57.525 79.8,73.645 P14.8@76.65,76.795
NSLEEP_2: P7.2 P15.3 R9.1 U1.22 U7.1 | length 92
  Top Layer w0.354: U1.22@94.655,76.325 94.655,72.905 90.2,68.45 88.175,68.45 87.33,67.605 P15.3@87.33,66.175 87.33,58.617 87.537,58.41 97.218,58.41 97.425,58.617 97.425,59.025 98,59.6 98,61.15 100.3,63.45 110.275,63.45 111.175,64.35 118.49,64.35 P7.2@121.74,61.1 ; R9.1@120.1,43 120.1,43.264 120.468,43.632 121.432,43.632 122.9,45.1 ; U7.1@121.4,47.825 122.575,47.825 123,47.4 123,45.2 122.9,45.1 ; v1(121.5,46.6) 121.472,46.572 121.472,45.833 121.24,45.601 121.24,45.307 121.448,45.1 122.9,45.1
  Layer 2 w0.354: v1(121.5,46.6) 121.528,46.572 121.528,46.179 121.907,45.8 122.2,45.8 125.5,49.1 125.5,55.6 121.74,59.36 P7.2@121.74,61.1
RI: P3.3 U3.11 | length 11.5
  Top Layer w0.254: P3.3@131.5,85 133,86.5 134.5,86.5 135.75,87.75 135.75,89 136.655,89.905 U3.11@140.25,89.905
RS232: P3.1 U3.15 | length 11.7
  Top Layer w0.254: v1(138,83.25) 138,84 138.825,84.825 U3.15@140.25,84.825
  Layer 2 w0.254: P3.1@131.5,79.92 135.17,79.92 137.5,82.25 137.5,83 137.75,83.25 v1(138,83.25)
RST: Q1.2 R2.1 U3.14 | length 42.8
  Top Layer w0.254: 132.732,71.732 132,71 132,67.75 134.4,65.35 Q1.2@141.55,65.35 ; 132.75,71.75 139,71.75 139.25,72 139.25,73.101 139.101,73.25 R2.1@137.715,73.25 ; 133.5,71.775 133.5,72.75 132.5,73.75 132.5,75.75 136.25,79.5 136.25,83.25 139.095,86.095 U3.14@140.25,86.095
UART1: P2.7 U1.36 U3.2 | length 75.9
  Top Layer w0.254: U1.36@101.5,89.005 104.42,89.005 107.872,85.553 108.412,85.553 P2.7@108.65,85.315 ; U3.2@145.75,84.825 146.675,84.825 147.75,83.75 v1(147.75,82)
  Layer 2 w0.254: P2.7@108.65,85.315 106.935,85.315 105.25,87 105.25,95.75 106.25,96.75 123,96.75 124.6,95.15 134.1,95.15 136,93.25 136,91.25 145.25,82 v1(147.75,82)
UART2: P2.8 U1.37 U3.3 | length 73.4
  Top Layer w0.254: U1.37@101.5,90.275 104.625,90.275 107.045,87.855 P2.8@108.65,87.855 ; U3.3@145.75,86.095 146.905,86.095 149,84 v1(149,81.75)
  Layer 2 w0.254: P2.8@108.65,87.855 108.524,87.981 107.519,87.981 106.25,89.25 106.25,94.25 107.5,95.5 118,95.5 119.5,94 133,94 133.75,93.25 133.75,91.5 143.5,81.75 143.5,81.399 144.03,80.869 148.119,80.869 v1(149,81.75)
VBANK: C20.P C23.2 FL1.2 V_MOTOR.3 V_MOTOR.6 | length 48.8
  Top Layer w1: V_MOTOR.6@24.5,82 V_MOTOR.3@24.5,87.25 24.5,87.45 24.6,87.55 24.8,87.55 27.25,90 46.75,90 48.85,92.1 C23.2@48.85,94.25 48.85,96.85 50.211,98.211 50.211,99.039 ; FL1.2@47.86,99.75 49.5,99.75 50.211,99.039 ; C20.P@56.75,99.615 56.75,99.349 56.44,99.039 50.211,99.039
VBAT: BT1.P2 V_MOTOR.1 V_MOTOR.4 | length 197.5
  Top Layer w1: v1(10.5,86.75) 10.5,89.35 12.4,91.25 18.914,91.25 19.5,90.664 V_MOTOR.1@19.5,87.25 ; v1(11.5,79.75) 17,79.75 17.75,79 18.914,79 19.5,79.586 V_MOTOR.4@19.5,82
  Bottom Layer w1: v1(10.5,86.75) 7.75,84 5.75,84 4.25,82.5 4.25,79.75 ; v1(11.5,79.75) 4.25,79.75 ; BT1.P2@66.645,19.385 63.97,16.71 60.21,16.71 57.25,13.75 57.25,5 52,-0.25 20.25,-0.25 20,0 15,0 0.25,14.75 0.25,69 0.5,69.25 0.5,76 4.25,79.75
VBUS: D1.C P8.1 V_MODE.3 V_MODE.6 | length 189.5
  Top Layer w0.254: P8.1@138.25,12.175 138.25,40 156.739,58.489 184.739,58.489 188,61.75 188,74.75 187.75,75 162.25,75 160.25,73 158,73 157.5,72.5 ; D1.C@149.25,100.57 149.43,100.75 152.351,100.75 152.5,100.601 v1(152.5,98.75) ; v1(156.75,94.25) 156.75,76.75 157.5,76 157.5,72.5 ; V_MODE.3@175.75,65.675 V_MODE.6@175.75,70.925 167.275,70.925 167.071,70.721 159.069,70.721 157.5,72.29 157.5,72.5
  Layer 2 w0.254: v1(152.5,98.75) 153.292,98.75 156.77,95.273 v1@156.77,94.48
VCC: C11.1 C12.1 C16.1 CV.1 P1.1 P5.1 P5.2 P8.4 R4.2 R8.2 U5.12 U7.12 V_MODE.1 V_MODE.4 V_MOTOR.2 V_MOTOR.5 | length 423.3
  Top Layer w0.5: 33.85,78.425 38.625,78.425 51.625,91.425 59.438,91.425 60.862,92.85 68.675,92.85 68.9,93.075 P1.1@72.15,93.075 ; U5.12@79.15,49.775 81.675,49.775 82.05,49.4 C11.1@84.2,49.4 ; C11.1@84.2,49.218 84.582,49.218 86.5,47.3 ; CV.1@86.6,42.7 84.293,42.7 84,42.993 84,44.7 85.6,46.3 86.207,46.3 86.5,46.593 86.5,47.3 ; R4.2@88.005,54.75 94.107,54.75 94.4,54.457 94.4,47.6 94.1,47.3 86.5,47.3 ; C16.1@103.8,55.393 104.55,54.643 105.957,54.643 110.62,49.98 111.72,49.98 C12.1@112,49.7 112.3,50 113,50 113.4,50.4 113.5,50.4 113.525,50.425 U7.12@115.6,50.425 ; P8.4@130.63,12.175 130.63,38.13 136,43.5 137.5,43.5 154,60 177.05,60 180.482,63.432 180.482,65.407 V_MODE.1@180.75,65.675 V_MODE.4@180.75,70.925
  Top Layer w1: V_MOTOR.2@22,87.25 V_MOTOR.5@22,82 22,79.061 22.586,78.475 33.85,78.475 42.5,69.825 42.5,50.225 59,33.725 68.175,33.725 68.2,33.75 88.5,33.75 ; C16.1@103.8,55.393 103.8,55 103.3,54.5 99,54.5 96,51.5 96,47.5 ; R8.2@111.53,43.385 109.563,45.352 108.648,45.352 107.75,46.25 105.5,46.25 105.25,46 100.75,46 98.5,48.25 96.75,48.25 96,47.5 ; P8.4@130.63,12.175 121.825,12.175 100.25,33.75 88.5,33.75 ; 88.5,33.75 86.5,35.75 86.5,42.6 86.6,42.7 87,43.1 CV.1@87.15,43.1 87.15,45.414 87.736,46 90.75,46 91,45.75 94.25,45.75 96,47.5
  Bottom Layer w0.5: P8.4@130.63,12.175 130.63,10.37 131.5,9.5 135.75,9.5 138.79,6.46 ; P5.1@136.25,2.425 136.25,6 136.71,6.46 138.79,6.46 ; P5.2@138.79,2.425 138.79,6.46
pads on no net: BT1. BT2. J9. J9.A8 J9.B8 J10. J10.A8 J10.B8 JH1_1.1 JH1_1.2 JH1_1.3 JH1_1.4 JH1_1.5 JH1_1.6 JH1_1.7 JH1_1.8 JH1_1.9 JH1_1.10 JH1_1.11 JH1_1.12 JH1_1.13 JH1_1.14 JH1_1.15 JH1_1.16 JH1_1.17 JH1_1.18 JH1_1.19 JH1_1.20 JH2.1 JH2.2 JH2.3 JH2.4 JH2.5 JH2.6 JH2.7 JH2.8 JH2.9 JH2.10 JH2.11 JH2.12 JH2.13 JH2.14 JH2.15 JH2.16 JH2.17 JH2.18 JH2.19 JH2.20 JH2_1.1 JH2_1.2 JH2_1.3 JH2_1.4 JH2_1.5 JH2_1.6 JH2_1.7 JH2_1.8 JH2_1.9 JH2_1.10 JH2_1.11 JH2_1.12 JH2_1.13 JH2_1.14 JH2_1.15 JH2_1.16 JH2_1.17 JH2_1.18 JH2_1.19 JH2_1.20 JH3.1 JH3.2 JH3.3 JH3.4 JH3.5 JH3.6 JH3.7 JH3.8 JH3.9 JH3.10 JH3.11 JH3.12 JH3.13 JH3.14 JH3.15 JH3.16 JH3.17 JH3.18 JH3.19 JH3.20 JH6.1 JH6.2 JH6.3 JH6.4 JH6.5 JH6.6 JH6.7 JH6.8 JH6.9 JH6.10 JH7.1 JH7.2 JH7.3 JH7.4 JH7.5 JH7.6 JH7.7 JH7.8 JH7.9 JH7.10 JH7_1.1 JH7_1.2 JH7_1.3 JH7_1.4 JH7_1.5 JH7_1.6 JH7_1.7 JH7_1.8 JH7_1.9 JH7_1.10 JH7_2.1 JH7_2.2 JH7_2.3 JH7_2.4 JH7_2.5 JH7_2.6 JH7_2.7 JH7_2.8 JH7_2.9 JH7_2.10 JH7_3.1 JH7_3.2 JH7_3.3 JH7_3.4 JH7_3.5 JH7_3.6 JH7_3.7 JH7_3.8 JH7_3.9 JH7_3.10 JH8.1 JH8.2 JH8.3 JH8.4 JH8.5 JH8.6 JH8.7 JH8.8 JH8.9 JH8.10 JH8_1.1 JH8_1.2 JH8_1.3 JH8_1.4 JH8_1.5 JH8_1.6 JH8_1.7 JH8_1.8 JH8_1.9 JH8_1.10 JH9.1 JH9.2 JH9.3 JH9.4 JH9.5 JH9.6 JH9.7 JH9.8 JH9.9 JH9.10 M1.1 M2.1 M3.1 M4.1 SW1.1 SW1.4 SW1.5 SW1.6 SW2.1 SW2.4 SW2.5 SW2.6

## Polygon pours and split planes (outlines as drawn)
GND on Bottom Layer "GND_L04_P007" (solid, pour order 7): 144.25,96 144.25,-0.5 52.75,-0.5 52.75,96
GND on Layer 2 "GND_L03_P003" (solid, pour order 3): 0.894,83.894 0.168,14.915 ccw(c15.916,14.75) 15.916,-1 194,-1 194.293,-0.707 ccw(c190.172,3.414) 196,3.414 196,91 191,96 167,96 167,112 165,114 27,114 26.4,113.4 26.4,96.065 13.065,96.065
GND on Layer 1 "GND_L02_P000" (solid, pour order 0): 167.216,105.162 167.216,111.5 26.927,111.5 ccw(c74.49,103.449) 26.927,95.399 22.923,95.398 ccw(c22.885,68.838) -2.75,75.789 -2.75,15.568 ccw(c21.035,23.204) 21.035,-1.776 191.814,-1.776 ccw(c191.814,1.616) 195.205,1.651 194.279,91.202 ccw(c171.555,88.101) 193.875,93.375 ccw(c173.508,74.883) 192,95.25 ccw(c176.426,-429.469) 167.216,95.4 ccw(c69.283,100.281)

## Other copper
Layer 1:
  pour cut-out: 31.825,100.425 31.825,98.941 33.575,98.941 33.575,100.425
  pour cut-out: 31.663,105.973 33.713,105.973 33.713,104.575 31.738,104.575 31.663,104.65
  pour cut-out: 161.9,105.9 160.62,105.9 160.598,105.878 160.598,104.769 161.844,104.769 161.9,104.825
  pour cut-out: 160.476,100.331 160.476,99.1 162.1,99.1 162.1,100.309
  pour cut-out: 72.4,0.5 72.4,-3.1 68.4,-3.1 68.4,0.5
  pour cut-out: 71.9,31.1 71.9,27.5 67.9,27.5 67.9,31.1
Layer 2:
  pour cut-out: 31.8,105.987 31.927,105.987 33.675,105.987 33.675,104.613 31.8,104.613
  pour cut-out: 31.75,100.225 31.75,98.9 33.7,98.9 33.7,100.225
  pour cut-out: 162.276,100.231 162.276,99.1 160.211,99.1 160.211,100.166
  pour cut-out: 160.414,105.944 162.194,105.944 162.2,105.95 162.2,104.738 160.403,104.738
  pour cut-out: 73.05,31.3 73.05,27.9 73.15,27.8 72.95,27.6 66.95,27.6 66.95,31.3
  pour cut-out: 73.3,1 73.3,-2.4 73.4,-2.5 73.2,-2.7 67.2,-2.7 67.2,1
Bottom Layer:
  pour cut-out: 68.4,30.569 68.4,28.1 71.3,28.1 71.158,30.569

## Silkscreen, mask and mechanical layers (free items; w line width, h text height)
Top Overlay:
  drawing of 19 lines, arcs and shapes, not listed
  text "BATT" at 10.754,84.429 h1.52
  text "BANK" at 27.754,84.429 h1.52
  text "EN" at 170.254,76.929 h1.52
  text "RESET" at 182.754,76.929 h1.52
  text "USB" at 168.504,67.429 h1.52
  text "VCC" at 184.004,67.429 h1.52
  text "R" at 193.004,56.929 h1.52
  text "M5" at 167.104,53.329 h1.52
  text "VCC" at 117.004,17.929 h1.52
  text "3V3" at 123.004,17.929 h1.52
  text "GND" at 128.504,17.929 h1.52
  text "VBUS" at 134.004,17.929 h1.52
  text "VCC" at 141.504,2.179 h1.52
  text "GND" at 141.704,-1.271 h1.52
Bottom Overlay:
  drawing of 2 lines, arcs and shapes, not listed
  text "B" at 154.496,36.421 h1.52 r180
Mechanical 1:
  rectangle: 14.65,39.575 18.65,43.575
  lines w0.254: 12.856,86.291 cw(c9.65,86.825) 12.9,86.825

## Text inside footprints (layer, text, board x,y; h text height)
J9: Mechanical 13 "PCB EDGE" at 26.5,97.1 h0.41 r270
J10: Mechanical 13 "PCB EDGE" at 167.4,107.9 h0.41 r90
P5: Top Overlay "1" at 135.25,4.8 h1.27 r270; Top Overlay "2" at 138.282,4.965 h1.27 r270; Top Overlay "4" at 138.275,-1.95 h1.27 r270; Top Overlay "3" at 135.75,-1.95 h1.27 r270
U11: Top Overlay "ITG/MPU" at 25.5,50.5 h1.27 r180; Top Overlay "y" at 16.92,57.27 h1.27 r270; Top Overlay "x" at 13.11,54.095 h1.27 r270